# Altium PCB PCB.PcbDoc (part 3 of 4)
Units mm, origin at the board's own origin, x right, y up, seen from the top; angles counter-clockwise.
Board outline 38 x 42 mm, 4 copper layers (Top Layer, Inner GND 1, Inner GND 2, Bottom Layer), stack 1.62 mm thick; 195 components, 172 nets, 763 pads, 474 vias.
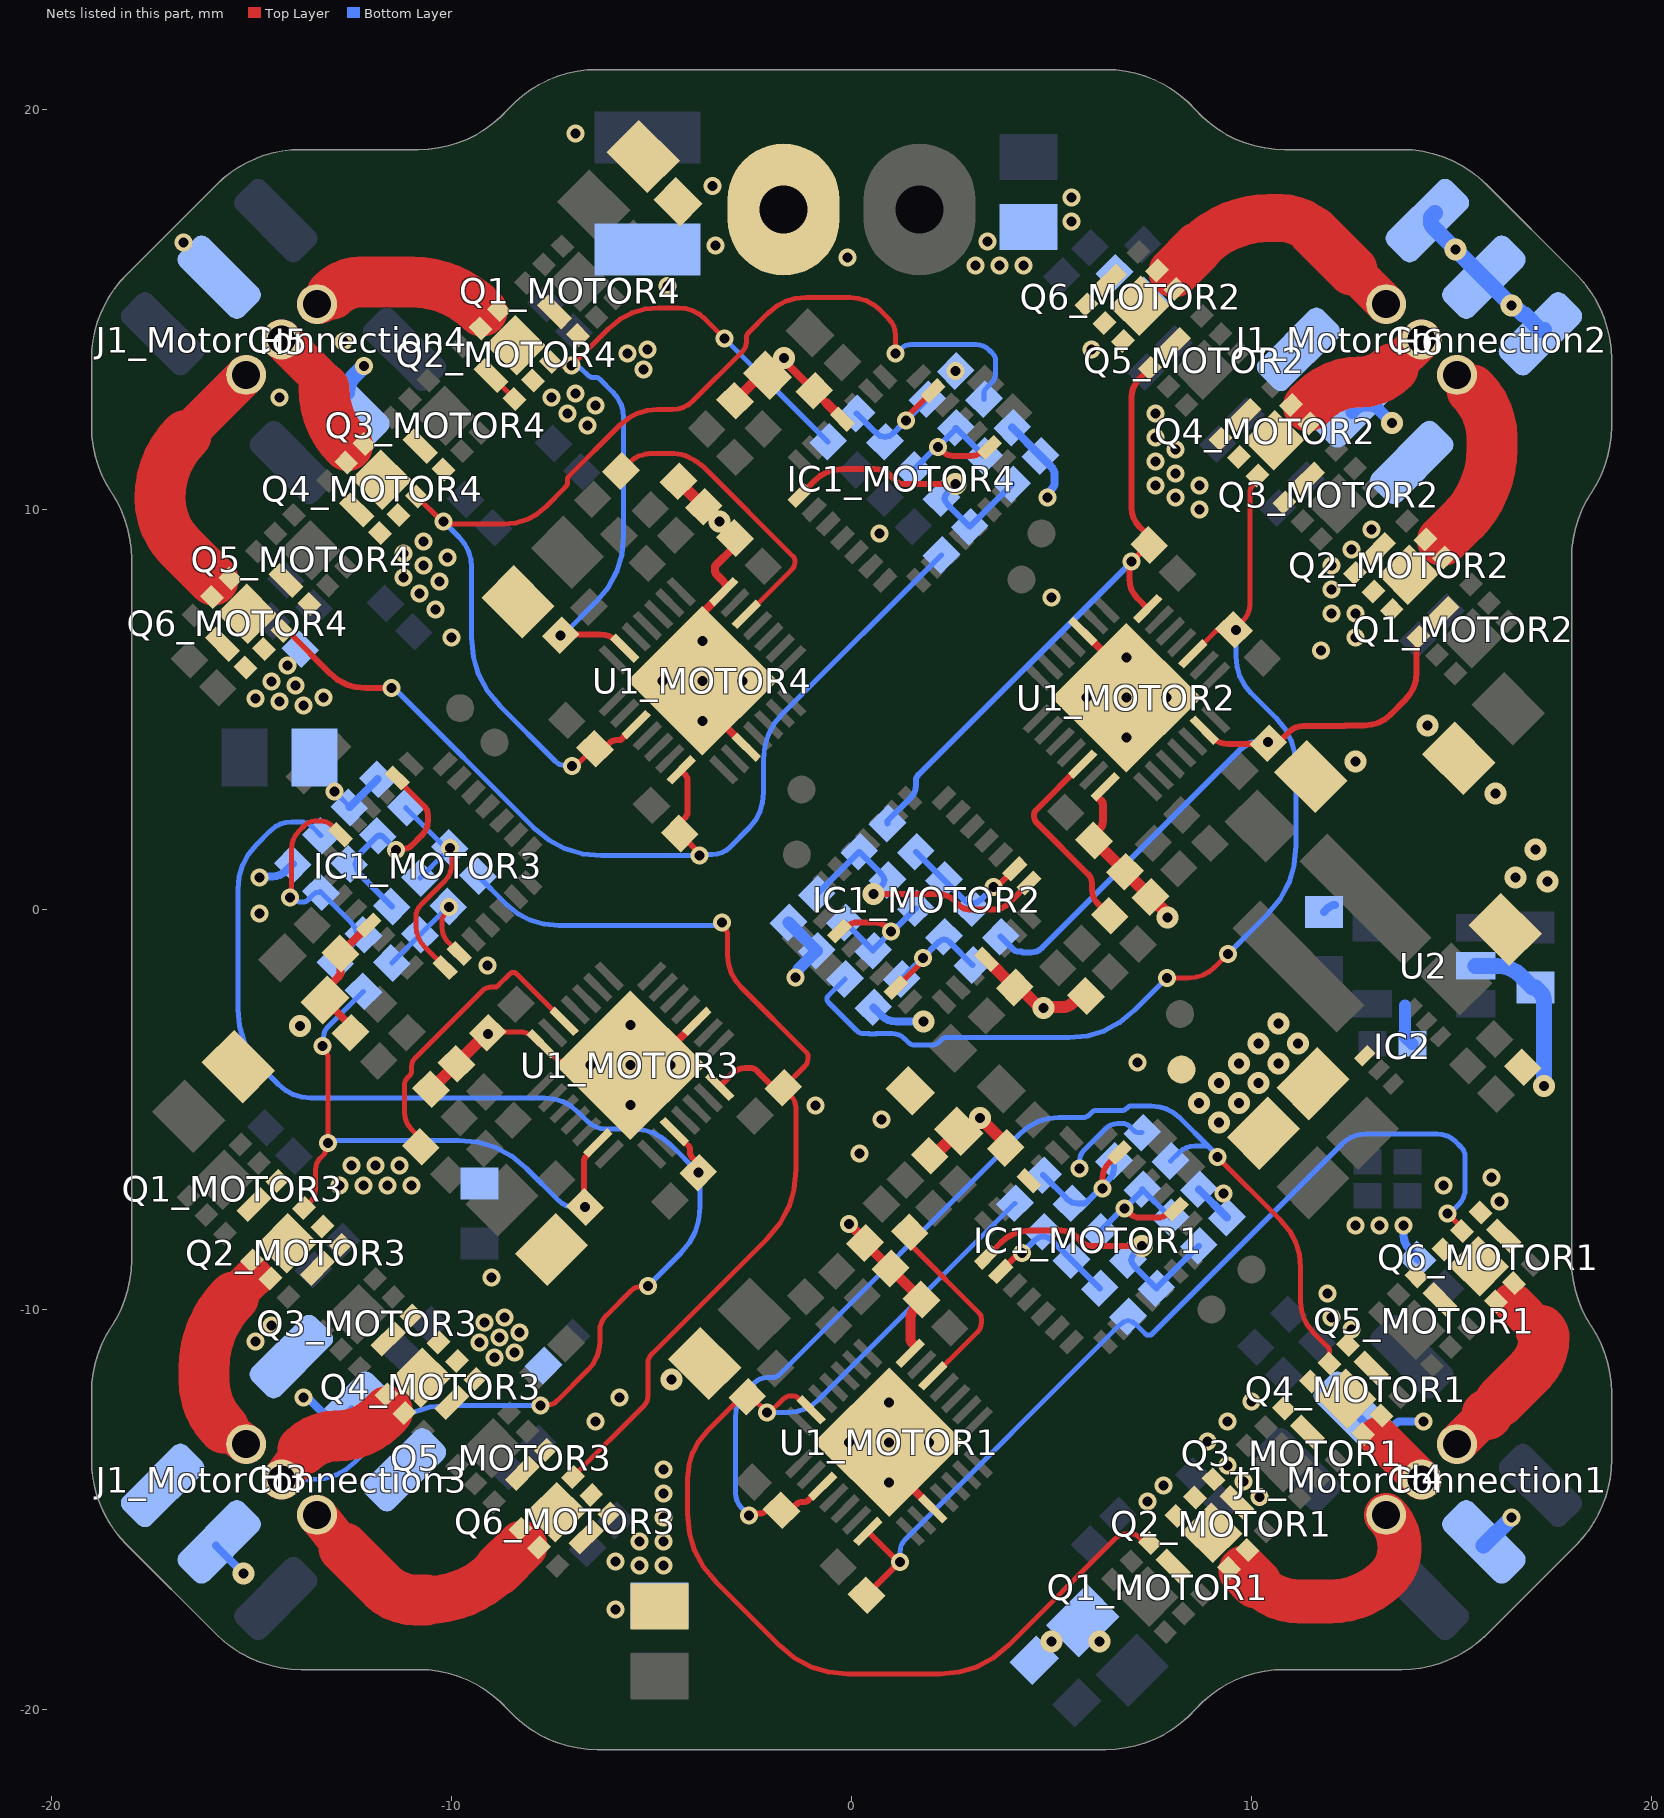
[diagram p5: the nets of this part, all layers, seen from the top]

## Via types
v1: diameter 0.45, hole 0.25, Top Layer to Bottom Layer, tented both sides, 381 vias
v2: diameter 0.55, hole 0.25, Top Layer to Bottom Layer, tented both sides, 93 vias

## Nets (pads, with @x,y where several pads share a name; then routed paths per layer and width w, separated by ;. In a path a pad name is that pad's centre, name@x,y a point inside that pad or via, vN(x,y) a via of type N, cw(c..) or ccw(c..) an arc to the next point about the centre after c; other vN are vias at no path point) (continued)
GND: C1_MOTOR1.1 C1_MOTOR2.1 C1_MOTOR3.1 C1_MOTOR4.1 C2_MOTOR1.1 C2_MOTOR2.1 C2_MOTOR3.1 C2_MOTOR4.1 C3_MOTOR1.1 C3_MOTOR2.1 C3_MOTOR3.1 C3_MOTOR4.1 C4_MOTOR1.1 C4_MOTOR2.1 C4_MOTOR3.1 C4_MOTOR4.1 C7_MOTOR1.1 C7_MOTOR2.1 C7_MOTOR3.1 C7_MOTOR4.1 C9_MOTOR1.1 C9_MOTOR2.1 C9_MOTOR3.1 C9_MOTOR4.1 C10_MOTOR1.1 C10_MOTOR2.1 C10_MOTOR3.1 C10_MOTOR4.1 C11_MOTOR1.1 C11_MOTOR2.1 C11_MOTOR3.1 C11_MOTOR4.1 C12_MOTOR1.1 C12_MOTOR2.1 C12_MOTOR3.1 C12_MOTOR4.1 C13_MOTOR1.1 C13_MOTOR2.1 C13_MOTOR3.1 C13_MOTOR4.1 C15.1 C16.1 C17.1 C18.1 C19.1 C20.1 C21.1 H1.1 H3.2 H3.5 H4.2 H4.5 H5.2 H5.5 H6.1 H6.2 H6.3 H6.5 IC1_MOTOR1.4 IC1_MOTOR2.4 IC1_MOTOR3.4 IC1_MOTOR4.4 IC2.4 Q2_MOTOR1.4 Q2_MOTOR1.8 Q2_MOTOR2.4 Q2_MOTOR2.8 Q2_MOTOR3.4 Q2_MOTOR3.8 Q2_MOTOR4.4 Q2_MOTOR4.8 Q4_MOTOR1.4 Q4_MOTOR1.8 Q4_MOTOR2.4 Q4_MOTOR2.8 Q4_MOTOR3.4 Q4_MOTOR3.8 Q4_MOTOR4.4 Q4_MOTOR4.8 Q6_MOTOR1.4 Q6_MOTOR1.8 Q6_MOTOR2.4 Q6_MOTOR2.8 Q6_MOTOR3.4 Q6_MOTOR3.8 Q6_MOTOR4.4 Q6_MOTOR4.8 R2_MOTOR1.1 R2_MOTOR2.1 R2_MOTOR3.1 R2_MOTOR4.1 R16_MOTOR1.1 R16_MOTOR2.1 R16_MOTOR3.1 R16_MOTOR4.1 R17_MOTOR1.1 R17_MOTOR2.1 R17_MOTOR3.1 R17_MOTOR4.1 R18_MOTOR1.1 R18_MOTOR2.1 R18_MOTOR3.1 R18_MOTOR4.1 R23.1 TP11.1 U1_MOTOR1.17 U1_MOTOR1.28 U1_MOTOR1.29 U1_MOTOR2.17 U1_MOTOR2.28 U1_MOTOR2.29 U1_MOTOR3.17 U1_MOTOR3.28 U1_MOTOR3.29 U1_MOTOR4.17 U1_MOTOR4.28 U1_MOTOR4.29 U2.2 | length 71.6
  Top Layer w0.125: R2_MOTOR3.1@-9.113,-3.109 v2(-9.091,-3.109) ; R2_MOTOR3.1@-9.037,-3.055 -8.305,-3.055 -8.212,-3.064 -8.126,-3.089 -8.047,-3.132 -7.975,-3.192 -7.824,-3.342 -7.815,-3.35 -7.806,-3.355 -7.795,-3.358 -7.784,-3.359 -7.768,-3.359 -7.761,-3.36 -7.755,-3.362 -7.75,-3.365 -7.745,-3.369 -7.446,-3.668 -7.329,-3.765 -7.201,-3.834 -7.062,-3.876 -6.91,-3.89 v2(-6.527,-3.89) U1_MOTOR3.29@-5.782,-3.89 ; Q2_MOTOR4.8@-9.014,13.352 Q2_MOTOR4.4@-8.429,12.767 ; v2@-1.856,13.71 -1.81,13.71 -1.792,13.711 -1.775,13.716 -1.76,13.725 -1.746,13.736 -1.703,13.779 -1.694,13.784 -1.691,13.774 -1.691,13.754 -1.69,13.74 -1.686,13.726 -1.679,13.714 v2@-1.67,13.703 ; C3_MOTOR1.1@0.323,-8.248 0.328,-8.255 0.333,-8.263 0.335,-8.271 0.336,-8.28 0.336,-8.302 0.337,-8.318 0.342,-8.333 0.349,-8.347 C3_MOTOR1.1@0.36,-8.36 ; v2(7.9,-0.2) v2@7.9,-0.152
  Top Layer w0.2: C9_MOTOR3.1@-12.527,-3.076 -12.527,-2.979 -12.531,-2.941 -12.542,-2.906 -12.559,-2.873 -12.584,-2.843 -13.084,-2.343 -13.119,-2.301 -13.144,-2.255 -13.159,-2.205 -13.164,-2.151 -13.164,-2.076 -13.161,-2.046 -13.153,-2.018 -13.139,-1.993 -13.12,-1.97 -12.831,-1.681 -12.806,-1.651 -12.789,-1.619 -12.778,-1.584 -12.775,-1.546 -12.775,-1.464 -12.774,-1.457 -12.773,-1.451 -12.77,-1.446 -12.765,-1.441 -12.759,-1.434 -12.757,-1.431 -12.755,-1.428 -12.754,-1.425 -12.754,-1.422 -12.754,-1.125 -12.754,-1.122 -12.755,-1.118 -12.757,-1.115 -12.759,-1.113 -12.765,-1.106 -12.769,-1.101 -12.77,-1.097 -12.769,-1.092 -12.765,-1.087 IC1_MOTOR3.4@-12.068,-0.389 ; U1_MOTOR3.29@-5.782,-3.89 v2(-5.527,-3.89) -5.101,-3.89 -5.034,-3.884 -4.972,-3.865 -4.914,-3.834 -4.862,-3.791 U1_MOTOR3.17@-3.865,-2.794 ; R2_MOTOR4.1@-2.914,9.291 -2.914,9.178 -2.918,9.134 -2.93,9.093 -2.951,9.055 -2.979,9.021 -3.388,8.612 -3.401,8.597 -3.41,8.58 -3.415,8.562 -3.417,8.542 -3.417,8.492 -3.414,8.456 -3.404,8.423 -3.388,8.392 -3.364,8.364 -3.204,8.204 -3.154,8.138 -3.138,8.072 -3.154,8.006 -3.204,7.94 -3.605,7.539 -3.659,7.475 -3.697,7.404 -3.72,7.327 -3.727,7.244 v2(-3.727,6.72) v2(-3.727,5.72) -3.727,5.409 -3.716,5.286 -3.682,5.173 -3.626,5.069 -3.547,4.974 U1_MOTOR4.17@-2.631,4.058 ; v2@-1.67,13.703 -0.775,12.808 -0.616,12.649 ; v2(0.937,-13.321) 0.937,-13.632 0.948,-13.755 0.982,-13.868 1.038,-13.972 1.117,-14.067 U1_MOTOR1.17@2.033,-14.983 ; C9_MOTOR1.1@1.955,-6.155 2.014,-6.155 2.038,-6.153 2.059,-6.147 2.079,-6.136 C9_MOTOR1.1@2.097,-6.121 ; C2_MOTOR1.1@3.855,-5.963 C2_MOTOR1.1@3.855,-5.904 ; U1_MOTOR2.17@5.777,6.959 6.693,6.043 6.772,5.949 6.828,5.845 6.862,5.731 6.873,5.609 v2(6.873,5.297) ; R2_MOTOR2.1@6.06,1.788 R2_MOTOR2.1@6.06,1.862 ; R2_MOTOR2.1@6.06,1.998 R2_MOTOR2.1@6.06,1.862 ; U1_MOTOR2.28@6.343,3.07 6.19,2.918 6.163,2.881 6.154,2.844 6.163,2.808 6.19,2.771 6.24,2.722 6.257,2.701 6.27,2.678 6.277,2.652 6.28,2.625 6.28,2.222 6.274,2.155 6.255,2.092 6.224,2.035 6.181,1.983 R2_MOTOR2.1@6.06,1.862
  Top Layer w0.25: C9_MOTOR4.1@-2.914,12.72 -1.973,13.661 -1.948,13.682 -1.92,13.698 -1.889,13.707 v2@-1.856,13.71 ; -0.616,12.649 IC1_MOTOR4.4@-0.227,12.26 ; v1(-0.062,-7.863) C3_MOTOR1.1@0.323,-8.248 ; C3_MOTOR1.1@0.36,-8.36 1.742,-9.742 1.745,-9.746 1.748,-9.751 1.749,-9.756 1.75,-9.762 1.75,-9.777 1.749,-9.787 1.746,-9.797 1.741,-9.806 1.735,-9.814 1.594,-9.954 1.539,-10.021 1.499,-10.094 1.475,-10.175 1.467,-10.261 1.467,-10.711 1.471,-10.749 1.481,-10.785 1.499,-10.817 1.523,-10.847 U1_MOTOR1.28@1.592,-10.915
  Top Layer w0.3: C3_MOTOR3.1@-10.512,-4.491 -9.143,-3.122 -9.136,-3.116 -9.129,-3.112 -9.121,-3.11 R2_MOTOR3.1@-9.113,-3.109 ; C3_MOTOR4.1@-4.328,10.705 R2_MOTOR4.1@-2.914,9.291 ; C9_MOTOR1.1@2.097,-6.121 C1_MOTOR1.1@2.679,-5.539 ; v2(3.209,-5.209) 3.821,-5.821 3.836,-5.839 3.847,-5.859 3.853,-5.88 C2_MOTOR1.1@3.855,-5.904 ; IC1_MOTOR2.4@3.373,-1.243 4.044,-1.914 4.063,-1.93 4.084,-1.941 4.107,-1.948 4.132,-1.95 4.167,-1.95 4.18,-1.952 4.193,-1.955 4.205,-1.962 4.215,-1.97 4.678,-2.434 4.694,-2.446 4.711,-2.456 4.729,-2.461 4.749,-2.463 v2(4.8,-2.463) ; v2@4.8,-2.5 4.834,-2.466 4.848,-2.454 4.864,-2.446 4.881,-2.44 4.9,-2.439 5.252,-2.439 5.337,-2.431 5.415,-2.408 5.487,-2.369 5.552,-2.314 5.653,-2.213 5.68,-2.191 5.709,-2.175 5.741,-2.166 5.775,-2.163 C9_MOTOR2.1@5.863,-2.163 ; R2_MOTOR2.1@6.06,1.788 6.063,1.758 6.071,1.731 6.084,1.706 6.103,1.683 7.872,-0.086 7.884,-0.1 7.893,-0.116 7.898,-0.134 v2@7.9,-0.152
  Bottom Layer w0.125: H3.5@-15.897,-15.9 H3.5@-15.897,-15.897 ; v1(-12.925,2.95) -12.561,2.586 -12.558,2.583 -12.557,2.58 -12.556,2.577 -12.556,2.574 R17_MOTOR3.1@-12.556,2.566 ; v1(5.7,-6.475) 5.7,-6.283 5.707,-6.207 5.728,-6.137 5.763,-6.072 5.811,-6.014 6.346,-5.479 6.414,-5.422 6.488,-5.382 6.569,-5.358 6.657,-5.35 6.779,-5.35 6.827,-5.354 6.872,-5.368 6.913,-5.39 6.95,-5.421 7.057,-5.528 7.084,-5.55 7.113,-5.565 7.144,-5.575 7.178,-5.578 R16_MOTOR1.1@7.265,-5.578 ; H6.5@12.503,12.445 H6.5@12.503,12.503
  Bottom Layer w0.2: H3.5@-15.895,-15.905 v2(-15.2,-16.6) ; v1(-14.8,0.8) -14.782,0.818 -14.774,0.824 -14.766,0.829 -14.757,0.832 -14.747,0.833 -14.473,0.833 -14.379,0.841 -14.292,0.867 -14.212,0.91 -14.14,0.97 R16_MOTOR3.1@-13.97,1.139 R16_MOTOR3.1@-13.97,1.139 ; v1(-13.697,-12.195) -13.671,-12.221 -13.66,-12.23 -13.647,-12.237 -13.634,-12.241 -13.619,-12.242 -13.585,-12.242 -13.572,-12.244 -13.56,-12.247 -13.548,-12.253 -13.538,-12.262 -13.275,-12.525 -13.198,-12.589 -13.114,-12.635 -13.022,-12.662 -12.923,-12.671 -12.722,-12.671 -12.697,-12.669 -12.675,-12.662 -12.654,-12.651 -12.635,-12.635 H3.2@-12.592,-12.591 H3.2@-12.503,-12.503 ; H5.5@-12.614,12.923 -12.614,12.628 -12.613,12.621 -12.612,12.615 -12.608,12.609 -12.604,12.604 H5.5@-12.592,12.591 ; R17_MOTOR3.1@-12.556,2.566 -12.553,2.558 -12.547,2.562 R18_MOTOR3.1@-11.849,3.26 ; R16_MOTOR2.1@0.545,-2.445 0.74,-2.64 0.824,-2.71 0.916,-2.76 1.016,-2.79 1.125,-2.8 v2(1.8,-2.8) ; R17_MOTOR4.1@4.015,12.048 R18_MOTOR4.1@4.723,11.341 4.988,11.075 5.026,11.03 5.054,10.979 5.07,10.924 5.076,10.865 5.076,10.679 5.072,10.634 5.059,10.593 5.039,10.555 5.01,10.52 4.93,10.44 4.915,10.422 4.904,10.403 4.898,10.381 4.896,10.358 v1(4.896,10.3) ; R17_MOTOR1.1@8.68,-6.992 R18_MOTOR1.1@9.387,-7.699 ; C21.1@11.809,-0.059 11.904,0.036 11.944,0.069 11.989,0.094 12.038,0.108 C21.1@12.09,0.113 ; H4.2@12.503,-12.503 H4.2@12.591,-12.591 12.821,-12.821 12.902,-12.889 12.992,-12.937 13.089,-12.966 13.195,-12.976 13.366,-12.976 13.42,-12.971 13.47,-12.956 13.515,-12.931 13.557,-12.897 13.61,-12.844 13.633,-12.824 13.658,-12.811 13.686,-12.803 13.715,-12.8 v1(14.3,-12.8) ; v1(13.8,-7.9) 13.8,-8.142 13.809,-8.237 13.835,-8.325 13.879,-8.406 13.94,-8.479 14.127,-8.666 14.136,-8.677 14.142,-8.688 14.145,-8.7 14.146,-8.713 C13_MOTOR1.1@14.146,-8.746
  Bottom Layer w0.3: R18_MOTOR2.1@-1.577,-0.324 R17_MOTOR2.1@-0.87,-1.031 -1.318,-1.479 -1.333,-1.497 -1.344,-1.517 -1.35,-1.539 -1.352,-1.562 -1.352,-1.622 -1.354,-1.636 -1.358,-1.65 -1.364,-1.662 -1.374,-1.674 v1(-1.4,-1.7) ; H6.5@12.503,12.445 12.511,12.418 12.536,12.431 12.628,12.523 12.668,12.556 12.711,12.579 12.759,12.593 12.81,12.598 12.959,12.598 13.018,12.593 13.073,12.576 13.123,12.549 13.169,12.511 v2(13.512,12.168) ; 13.837,-2.404 13.837,-3.186 14.007,-3.356 C20.1@14.029,-3.356
  Bottom Layer w0.4: H5.5@-12.614,12.923 -12.603,13.039 -12.572,13.146 -12.518,13.244 -12.444,13.334 v1(-12.185,13.592) ; H6.1@14.586,17.415 14.517,17.345 14.502,17.327 14.491,17.308 14.485,17.286 14.483,17.263 14.483,17.205 14.486,17.163 14.498,17.124 14.517,17.088 14.544,17.056 v2(15.1,16.5) 16.481,15.119 16.491,15.111 16.502,15.105 16.514,15.101 16.527,15.1 16.545,15.1 16.552,15.099 16.559,15.097 16.565,15.094 16.571,15.089 16.77,14.89 16.778,14.883 16.787,14.878 16.797,14.875 16.807,14.874 16.822,14.874 16.828,14.874 16.833,14.872 16.838,14.87 16.842,14.866 17.198,14.51 17.213,14.498 17.228,14.49 17.245,14.485 17.264,14.483 H6.3@17.311,14.483 ; U2.2@15.604,-1.409 16.141,-1.409 16.307,-1.424 16.46,-1.47 16.601,-1.546 16.729,-1.652 17.002,-1.926 17.015,-1.936 17.028,-1.944 17.043,-1.948 17.06,-1.95 17.082,-1.95 17.091,-1.951 17.1,-1.953 17.107,-1.957 17.114,-1.963 17.221,-2.07 17.26,-2.116 17.287,-2.167 17.304,-2.222 17.309,-2.282 v2(17.309,-4.409) ; H4.5@15.803,-15.897 v1(16.5,-15.2)
  other v1: -5.9,-17.5 -5.3,-16.4 -4.7,-16.4 -5.9,-16.3 -5.3,-15.8 -4.7,-15.8 -4.7,-15.2 7.4,-14.8 10.204,-14.69 -4.7,-14.6 7.8,-14.4 9.8,-14.3 -4.7,-14 9.4,-13.9 8.9,-13.3 -6.4,-12.8 9.4,-12.8 10,-12.3 -5.8,-12.2 -8.925,-11.2 -8.425,-11.075 -9.3,-10.825 -14.9,-10.8 -8.8,-10.7 -8.3,-10.575 12.5,-10.5 -14.5,-10.4 -9.175,-10.325 -8.675,-10.2 12,-10.2 11.9,-9.6 -9,-9.2 12.6,-7.9 13.2,-7.9 16.2,-7.3 9.296,-7.104 -12.8,-6.9 -12.2,-6.9 -11.6,-6.9 -11,-6.9 14.8,-6.9 16,-6.7 -12.5,-6.4 -11.9,-6.4 -11.3,-6.4 0.2,-6.1 0.75,-5.25 -0.9,-4.9 7.15,-3.825 -9.1,-1.4 -14.8,-0.1 -13.7,5.1 -14.3,5.2 -14.905,5.278 -13.2,5.3 -13.9,5.6 -14.5,5.7 -14.1,6.1 11.74,6.481 -10,6.8 12.6,6.8 12,7.4 12.6,7.4 -10.4,7.5 5,7.8 -10.8,7.9 12,8 -10.3,8.2 -11.2,8.3 -10.7,8.6 12,8.6 -10.1,8.8 -11.2,8.9 12.5,9 -10.7,9.2 0.7,9.4 13,9.5 8.7,10 8.1,10.3 7.6,10.6 8.7,10.6 8.1,10.9 7.6,11.2 8.1,11.5 7.6,11.8 -6.6,12.1 -7.1,12.4 7.6,12.4 -6.4,12.6 -14.3,12.8 -7.5,12.8 -6.9,12.9 2.601,13.463 -5.2,13.5 -5.6,13.9 -5.1,14 6,14 -12.7,14.2 -4.6,15.583 3.1,16.1 3.7,16.1 4.3,16.1 -0.1,16.3 -3.4,16.6 -16.7,16.675 3.4,16.7 5.5,17.2 5.5,17.8 -3.482,18.088 -6.9,19.4
  other v2: 5,-18.3 6.2,-18.3 0.937,-14.321 -0.063,-13.321 1.937,-13.321 0.937,-12.321 -4.5,-11.75 9.186,-5.328 -5.527,-4.89 8.691,-4.833 9.681,-4.833 9.186,-4.338 10.176,-4.338 -4.527,-3.89 9.681,-3.843 10.671,-3.843 10.176,-3.348 11.166,-3.348 -13.791,-2.909 -5.527,-2.89 10.671,-2.853 17.4,0.7 16.6,0.8 17.1,1.5 16.1,2.9 12.6,3.7 6.873,4.297 14.4,4.6 -3.727,4.72 5.873,5.297 7.873,5.297 -4.727,5.72 -2.727,5.72 6.873,6.297 -3.3,9.7 -1.691,13.791 16.5,15.1
MCU_ADC1: H3.3
MCU_I2C0_SCL: H6.4
MCU_I2C0_SDA: H6.6
MCU_UART1_RX: H3.4
MCU_UART1_TX: H3.1
OCREF_MOTOR1: R5_MOTOR1.1 U1_MOTOR1.26 | length 4.8
  Top Layer w0.125: R5_MOTOR1.1@1.458,-8.067 1.458,-8.227 1.463,-8.29 1.481,-8.348 1.51,-8.401 1.55,-8.45 3.19,-10.09 3.214,-10.119 3.231,-10.151 3.242,-10.186 3.245,-10.224 3.245,-10.32 3.239,-10.389 3.22,-10.453 3.188,-10.511 3.144,-10.564 2.417,-11.291 2.054,-11.654 2.051,-11.656 2.048,-11.658 2.045,-11.659 2.042,-11.659 U1_MOTOR1.26@2.033,-11.659
OCREF_MOTOR2: R5_MOTOR2.1 U1_MOTOR2.26 | length 5
  Top Layer w0.15: U1_MOTOR2.26@5.777,3.636 5.768,3.636 5.765,3.635 5.762,3.635 5.759,3.633 5.756,3.631 4.601,2.476 4.585,2.457 4.574,2.436 4.567,2.413 4.565,2.388 4.565,2.325 4.569,2.28 4.581,2.239 4.602,2.201 4.631,2.166 5.922,0.875 5.96,0.829 5.987,0.779 6.004,0.724 6.009,0.665 6.009,0.515 6.019,0.407 6.049,0.307 6.098,0.216 6.167,0.133 R5_MOTOR2.1@6.455,-0.155
OCREF_MOTOR3: R5_MOTOR3.1 U1_MOTOR3.26 | length 7.5
  Top Layer w0.125: R5_MOTOR3.1@-10.772,-5.928 -10.772,-5.817 -10.776,-5.774 -10.788,-5.733 -10.808,-5.696 -10.836,-5.663 -10.994,-5.505 -11.073,-5.409 -11.13,-5.305 -11.164,-5.19 -11.175,-5.067 -11.175,-4.387 -11.171,-4.333 -11.156,-4.284 -11.131,-4.238 -11.097,-4.197 -11.043,-4.143 -11.024,-4.121 -11.011,-4.096 -11.003,-4.068 -11,-4.039 -11,-3.907 -10.995,-3.856 -10.981,-3.808 -10.957,-3.764 -10.924,-3.724 -9.226,-2.026 -9.182,-1.989 -9.133,-1.963 -9.08,-1.947 -9.022,-1.941 -8.941,-1.941 -8.91,-1.939 -8.881,-1.93 -8.854,-1.915 -8.829,-1.895 -8.543,-1.609 -8.526,-1.594 -8.507,-1.584 -8.486,-1.578 -8.463,-1.576 -8.432,-1.576 -8.42,-1.577 -8.408,-1.58 -8.398,-1.586 -8.388,-1.594 U1_MOTOR3.26@-7.189,-2.794
OCREF_MOTOR4: R5_MOTOR4.1 U1_MOTOR4.26 | length 7.4
  Top Layer w0.125: R5_MOTOR4.1@-5.765,10.965 -5.537,11.193 -5.438,11.275 -5.33,11.334 -5.208,11.37 -5.158,11.383 -5.107,11.393 -5.055,11.398 -5.004,11.4 -4.443,11.4 -4.344,11.394 -4.249,11.376 -4.157,11.347 -4.067,11.305 -3.945,11.239 -3.9,11.213 -3.856,11.185 -3.813,11.154 -3.772,11.122 -3.673,11.04 -1.455,8.822 -1.439,8.802 -1.428,8.781 -1.421,8.759 -1.419,8.734 -1.419,8.671 -1.423,8.626 -1.435,8.584 -1.456,8.546 -1.485,8.512 -2.61,7.386 -2.613,7.384 -2.616,7.383 -2.619,7.382 -2.622,7.381 U1_MOTOR4.26@-2.631,7.381
PHASE_A1: C5_MOTOR1.1 J1_MotorConnection1.1 Q1_MOTOR1.4 Q1_MOTOR1.8 Q2_MOTOR1.1 Q2_MOTOR1.2 Q2_MOTOR1.5 Q2_MOTOR1.6 Q2_MOTOR1.7 R13_MOTOR1.1 U1_MOTOR1.6 | length 34.6
  Top Layer w0.125: v1@-2.149,-12.601 -2.149,-12.564 -2.15,-12.55 -2.154,-12.536 -2.161,-12.524 -2.17,-12.513 -2.455,-12.228 -2.479,-12.208 -2.505,-12.194 -2.533,-12.186 -2.563,-12.183 -2.641,-12.183 -2.697,-12.188 -2.748,-12.203 -2.795,-12.229 -2.838,-12.264 -3.599,-13.026 -3.818,-13.289 -3.975,-13.578 -4.069,-13.893 -4.1,-14.235 -4.1,-15.1 -4.056,-15.582 -3.923,-16.027 -3.702,-16.435 -3.393,-16.807 -1.798,-18.402 -1.426,-18.711 -1.018,-18.932 -0.573,-19.065 -0.091,-19.109 2.209,-19.109 2.691,-19.065 3.136,-18.932 3.544,-18.711 3.916,-18.402 6.584,-15.734 6.65,-15.679 6.722,-15.64 6.8,-15.617 6.885,-15.609 7.004,-15.609 7.05,-15.613 7.093,-15.626 7.133,-15.648 7.169,-15.678 7.283,-15.791 7.305,-15.81 7.329,-15.823 7.355,-15.831 7.384,-15.833 Q1_MOTOR1.4@7.456,-15.833 ; v1(-2.115,-12.567) -2.075,-12.567 -2.059,-12.566 -2.045,-12.562 -2.032,-12.554 -2.019,-12.544 -1.715,-12.24 -1.674,-12.206 -1.629,-12.181 -1.579,-12.167 -1.526,-12.162 -1.451,-12.162 -1.421,-12.164 -1.394,-12.172 -1.369,-12.186 -1.346,-12.205 -1.055,-12.496 -1.049,-12.501 -1.042,-12.505 -1.035,-12.507 -1.027,-12.508 U1_MOTOR1.6@-1.008,-12.508
  Top Layer w1.1: 10.115,-16.84 ccw(c11.224,-15.731) 11.224,-17.3 11.951,-17.3 ccw(c11.951,-15.251) 13.4,-16.7 ccw(c12.676,-15.976) 13.7,-15.976 13.7,-15.94 ccw(c12.56,-15.94) J1_MotorConnection1.1@13.366,-15.134
  Top Layer w1.273: 9.811,-16.537 10.115,-16.84
  Bottom Layer w0.125: v1(-2.115,-12.567) -1.578,-12.567 -1.366,-12.548 -1.17,-12.49 -0.991,-12.393 -0.827,-12.257 R13_MOTOR1.1@4.083,-7.346
PHASE_A2: C5_MOTOR2.1 J1_MotorConnection2.1 Q1_MOTOR2.4 Q1_MOTOR2.8 Q2_MOTOR2.1 Q2_MOTOR2.2 Q2_MOTOR2.5 Q2_MOTOR2.6 Q2_MOTOR2.7 R13_MOTOR2.1 U1_MOTOR2.6 | length 20.9
  Top Layer w0.15: U1_MOTOR2.6@8.818,4.484 8.837,4.484 8.845,4.484 8.852,4.482 8.858,4.478 8.864,4.473 9.049,4.289 9.128,4.223 9.215,4.176 9.31,4.148 9.412,4.138 C5_MOTOR2.1@10.297,4.138 ; C5_MOTOR2.1@10.418,4.159 C5_MOTOR2.1@10.44,4.181 ; C5_MOTOR2.1@10.419,4.181 10.414,4.186 10.412,4.19 10.416,4.191 10.567,4.191 10.627,4.196 10.682,4.213 10.733,4.24 10.779,4.279 10.95,4.45 11.024,4.512 11.106,4.556 11.194,4.582 11.29,4.591 12.331,4.591 12.335,4.591 12.338,4.592 12.342,4.594 12.345,4.597 12.349,4.601 12.35,4.602 12.352,4.603 12.354,4.604 12.356,4.604 12.823,4.604 13.006,4.621 13.176,4.671 13.332,4.756 13.474,4.874 13.833,5.233 13.961,5.387 14.053,5.557 14.108,5.742 14.127,5.942 14.127,6.562 14.128,6.577 14.132,6.591 14.139,6.604 14.149,6.616 14.164,6.631 14.169,6.637 14.173,6.644 14.175,6.652 14.176,6.661 Q1_MOTOR2.4@14.176,6.82
  Top Layer w1: J1_MotorConnection2.1@15.134,13.366 15.514,12.986
  Top Layer w1.273: 14.777,9.223 15.265,9.712 ccw(c13.469,11.508) 16.009,11.508 16.009,11.791 ccw(c14.319,11.791) 15.514,12.986
  Bottom Layer w0.15: R13_MOTOR2.1@3.727,-0.678 4.052,-1.003 4.078,-1.024 4.105,-1.039 4.136,-1.048 4.168,-1.051 4.238,-1.051 4.244,-1.052 4.25,-1.054 4.256,-1.057 4.261,-1.061 4.267,-1.067 4.27,-1.07 4.273,-1.071 4.276,-1.072 4.28,-1.072 4.481,-1.072 4.56,-1.065 4.633,-1.043 4.701,-1.007 4.762,-0.956 9.747,4.029 9.831,4.098 9.922,4.148 10.023,4.178 10.131,4.188 v1@10.404,4.188 ; v1@10.407,4.189 v1(10.409,4.191)
PHASE_A3: C5_MOTOR3.1 J1_MotorConnection3.1 Q1_MOTOR3.4 Q1_MOTOR3.8 Q2_MOTOR3.1 Q2_MOTOR3.2 Q2_MOTOR3.5 Q2_MOTOR3.6 Q2_MOTOR3.7 R13_MOTOR3.1 U1_MOTOR3.6 | length 19.8
  Top Layer w0.125: Q2_MOTOR3.6@-13.685,-7.463 -13.528,-7.306 -13.472,-7.239 -13.432,-7.164 -13.408,-7.084 -13.4,-6.996 -13.4,-6.495 -13.393,-6.417 -13.372,-6.346 -13.336,-6.28 -13.287,-6.221 -13.208,-6.142 -13.181,-6.11 -13.163,-6.076 -13.152,-6.038 -13.148,-5.998 -13.148,-5.934 -13.146,-5.915 -13.141,-5.897 -13.132,-5.881 -13.12,-5.866 v1(-13.086,-5.832) ; v1(-13.224,-3.406) -13.224,-3.454 -13.222,-3.473 -13.217,-3.491 -13.208,-3.507 -13.196,-3.522 -13.138,-3.579 -13.117,-3.604 -13.103,-3.631 -13.094,-3.661 -13.091,-3.693 v1@-13.091,-5.832
  Top Layer w0.15: v1(-6.665,-7.435) -6.677,-7.423 -6.681,-7.418 -6.684,-7.413 -6.686,-7.407 -6.686,-7.4 -6.686,-7.067 -6.686,-6.29 -6.683,-6.254 -6.673,-6.221 -6.657,-6.191 -6.634,-6.163 -6.581,-6.111 -6.576,-6.105 -6.573,-6.098 -6.571,-6.091 -6.57,-6.084 -6.57,-6.073 -6.57,-6.069 -6.569,-6.065 -6.567,-6.061 -6.564,-6.058 U1_MOTOR3.6@-6.34,-5.834
  Top Layer w1: -15.695,-12.957 J1_MotorConnection3.1@-15.134,-13.366 ; -15.446,-9.683 -14.957,-9.195
  Top Layer w1.273: -15.695,-12.957 cw(c-14.5,-11.762) -16.19,-11.762 -16.19,-11.479 cw(c-13.65,-11.479) -15.446,-9.683
  Bottom Layer w0.125: v1(-13.224,-3.406) -13.21,-3.392 -13.206,-3.387 -13.202,-3.38 -13.2,-3.373 -13.2,-3.366 -13.2,-3.187 -13.193,-3.116 -13.174,-3.051 -13.141,-2.991 -13.096,-2.937 R13_MOTOR3.1@-12.202,-2.043 ; v1(-13.086,-5.832) -13.051,-5.798 -13.037,-5.786 -13.021,-5.777 -13.003,-5.772 -12.984,-5.77 -12.854,-5.77 ; -12.851,-5.769 -12.85,-5.767 -9.833,-5.767 -9.351,-5.812 -8.906,-5.944 -8.497,-6.165 -8.125,-6.475 -7.324,-7.276 -7.241,-7.345 -7.149,-7.395 -7.049,-7.425 -6.94,-7.435 v1(-6.665,-7.435)
PHASE_A4: C5_MOTOR4.1 J1_MotorConnection4.1 Q1_MOTOR4.4 Q1_MOTOR4.8 Q2_MOTOR4.1 Q2_MOTOR4.2 Q2_MOTOR4.5 Q2_MOTOR4.6 Q2_MOTOR4.7 R13_MOTOR4.1 U1_MOTOR4.6 | length 23.1
  Top Layer w0.125: Q2_MOTOR4.6@-7.51,13.687 -7.393,13.687 -7.356,13.683 -7.321,13.673 -7.289,13.656 -7.26,13.631 -7.223,13.594 -7.207,13.581 -7.189,13.571 -7.17,13.566 -7.149,13.564 v1@-6.996,13.564 ; v1(-6.996,13.597) -6.065,14.529 -5.795,14.753 -5.499,14.913 -5.177,15.009 -4.827,15.041 -4.34,15.041 -4.148,15.024 -3.971,14.971 -3.808,14.883 -3.66,14.76 v1(-3.174,14.274)
  Top Layer w0.15: v1(-7.273,6.858) -6.94,6.858 -6.933,6.858 -6.927,6.86 -6.922,6.863 -6.917,6.867 -6.91,6.874 -6.907,6.876 -6.904,6.878 -6.901,6.879 -6.897,6.879 -6.274,6.879 -6.168,6.869 -6.07,6.84 -5.98,6.791 -5.898,6.723 -5.719,6.544 -5.713,6.539 -5.706,6.536 -5.699,6.534 -5.691,6.533 U1_MOTOR4.6@-5.672,6.533
  Top Layer w1: J1_MotorConnection4.1@-13.366,15.134 ccw(c-13.366,15.419) -13.165,15.217 J1_MotorConnection4.1@-12.991,15.391
  Top Layer w1.273: J1_MotorConnection4.1@-12.991,15.391 cw(c-12.267,14.667) -12.267,15.691 -11.009,15.691 cw(c-11.009,13.191) -9.241,14.959
  Bottom Layer w0.125: v1(-7.273,6.858) -7.246,6.858 -7.236,6.859 -7.226,6.862 -7.217,6.866 -7.209,6.873 -6.379,7.703 -6.082,8.06 -5.87,8.452 -5.742,8.88 -5.7,9.342 -5.7,12.284 -5.717,12.468 -5.767,12.638 -5.852,12.794 -5.97,12.935 -6.299,13.265 -6.318,13.28 -6.338,13.291 -6.36,13.298 -6.384,13.3 -6.444,13.3 -6.488,13.304 -6.528,13.316 -6.564,13.336 -6.598,13.364 -6.73,13.495 -6.75,13.513 -6.774,13.525 -6.799,13.533 -6.826,13.535 -6.895,13.535 -6.914,13.537 -6.931,13.542 -6.948,13.551 -6.962,13.563 v1(-6.996,13.597) ; v1(-3.174,14.274) R13_MOTOR4.1@-0.588,11.688
PHASE_B1: C8_MOTOR1.1 J1_MotorConnection1.2 Q3_MOTOR1.4 Q3_MOTOR1.8 Q4_MOTOR1.1 Q4_MOTOR1.2 Q4_MOTOR1.5 Q4_MOTOR1.6 Q4_MOTOR1.7 R14_MOTOR1.1 U1_MOTOR1.10 | length 29.3
  Top Layer w0.125: v1(9.143,-6.185) 10.739,-7.781 10.952,-8.036 11.103,-8.317 11.195,-8.623 11.225,-8.954 11.225,-9.794 11.245,-10.015 11.306,-10.22 11.408,-10.407 11.55,-10.578 11.905,-10.934 11.923,-10.955 11.936,-10.979 11.944,-11.005 11.946,-11.032 11.946,-11.103 11.946,-11.106 11.945,-11.109 11.944,-11.112 11.941,-11.115 11.936,-11.12 11.932,-11.125 11.929,-11.13 11.927,-11.136 11.927,-11.142 11.927,-11.311 11.927,-11.317 11.929,-11.323 11.932,-11.328 11.936,-11.332 Q4_MOTOR1.5@11.946,-11.343
  Top Layer w0.15: v1(-2.56,-15.143) -2.538,-15.121 -2.529,-15.113 -2.518,-15.108 -2.507,-15.104 -2.495,-15.103 -2.292,-15.103 -2.259,-15.1 -2.229,-15.091 -2.202,-15.076 -2.176,-15.055 -2.144,-15.023 -2.13,-15.012 -2.115,-15.003 -2.099,-14.998 -2.081,-14.997 -1.785,-14.997 -1.778,-14.997 -1.772,-14.999 -1.767,-15.002 -1.762,-15.006 -1.755,-15.013 -1.753,-15.015 -1.75,-15.017 -1.746,-15.018 -1.743,-15.018 -1.625,-15.018 -1.578,-15.014 -1.535,-15.001 -1.495,-14.979 -1.459,-14.95 -1.38,-14.87 -1.346,-14.842 -1.309,-14.822 -1.269,-14.81 -1.225,-14.806 -1.164,-14.806 -1.14,-14.804 -1.117,-14.797 -1.097,-14.786 -1.078,-14.77 U1_MOTOR1.10@-0.725,-14.417
  Top Layer w1: 13.17,-13.178 cw(c13.17,-13.198) 13.184,-13.184 J1_MotorConnection1.2@14.25,-14.25 cw(c14.25,-14.23) J1_MotorConnection1.2@14.236,-14.244
  Bottom Layer w0.125: v1(-2.56,-15.143) -2.747,-14.956 -2.814,-14.875 -2.862,-14.787 -2.89,-14.69 -2.9,-14.586 -2.9,-12.682 -2.883,-12.498 -2.832,-12.328 -2.748,-12.172 -2.63,-12.03 -2.433,-11.833 -2.363,-11.775 -2.286,-11.733 -2.203,-11.708 -2.112,-11.7 -1.985,-11.7 -1.936,-11.695 -1.89,-11.682 -1.847,-11.659 -1.809,-11.627 4.218,-5.6 4.428,-5.425 4.659,-5.3 4.911,-5.225 5.184,-5.2 5.764,-5.2 5.817,-5.195 5.867,-5.18 5.912,-5.156 5.954,-5.121 6.007,-5.068 6.029,-5.049 6.054,-5.036 6.082,-5.028 6.111,-5.025 6.755,-5.025 6.789,-5.022 6.82,-5.013 6.849,-4.997 6.875,-4.975 6.908,-4.942 6.922,-4.93 6.938,-4.922 6.955,-4.916 6.974,-4.915 7.491,-4.915 7.695,-4.934 7.884,-4.99 8.057,-5.083 8.214,-5.214 8.909,-5.909 ; R14_MOTOR1.1@7.973,-6.285 7.976,-6.285 7.978,-6.285 7.979,-6.285 7.981,-6.284 7.982,-6.283 8.187,-6.077 8.276,-6.004 8.373,-5.951 8.479,-5.92 8.594,-5.909 8.909,-5.909 ; v1(9.143,-6.185) 9.143,-6.162 9.142,-6.153 9.14,-6.144 9.136,-6.137 9.13,-6.13 8.909,-5.909
PHASE_B2: C8_MOTOR2.1 J1_MotorConnection2.2 Q3_MOTOR2.4 Q3_MOTOR2.8 Q4_MOTOR2.1 Q4_MOTOR2.2 Q4_MOTOR2.5 Q4_MOTOR2.6 Q4_MOTOR2.7 R14_MOTOR2.1 U1_MOTOR2.10 | length 29.9
  Top Layer w0.125: v1(7.88,-1.709) 8.427,-1.709 8.611,-1.692 8.781,-1.641 8.937,-1.557 9.079,-1.439 v1(9.409,-1.109) ; U1_MOTOR2.10@8.535,6.394 9.102,6.96 9.107,6.965 9.114,6.968 9.121,6.971 9.129,6.971 9.139,6.971 9.144,6.972 9.147,6.973 9.151,6.975 9.154,6.977 9.175,6.999 9.184,7.006 9.194,7.011 9.205,7.015 9.217,7.016 9.526,7.016 9.532,7.015 9.538,7.013 9.544,7.01 9.549,7.006 9.555,7 9.558,6.998 9.56,6.997 9.563,6.998 9.565,7 9.781,7.216 9.859,7.309 9.914,7.411 9.947,7.522 9.958,7.642 9.958,10.416 9.963,10.473 9.979,10.527 10.005,10.575 10.042,10.62 10.105,10.682 10.123,10.704 10.135,10.727 10.143,10.753 10.146,10.78 Q4_MOTOR2.6@10.146,10.85
  Top Layer w0.15: 13.546,13.532 13.546,13.546
  Top Layer w1: 13.532,13.532 J1_MotorConnection2.2@14.25,14.25
  Top Layer w1.273: 11.418,12.582 11.544,12.708 cw(c12.709,11.543) 12.709,13.191 ccw(c12.709,14.355) 13.532,13.532
  Bottom Layer w0.125: R14_MOTOR2.1@-0.163,-1.738 -0.592,-2.168 -0.6,-2.177 -0.606,-2.188 -0.609,-2.199 -0.61,-2.212 -0.61,-2.243 -0.608,-2.265 -0.602,-2.286 -0.592,-2.305 -0.577,-2.323 0.125,-3.025 0.164,-3.058 0.208,-3.081 0.255,-3.095 0.306,-3.1 0.431,-3.1 0.433,-3.1 0.436,-3.101 0.438,-3.102 0.44,-3.104 0.443,-3.106 0.444,-3.107 0.445,-3.108 0.446,-3.108 0.448,-3.109 0.596,-3.109 0.599,-3.108 0.601,-3.108 0.604,-3.106 0.606,-3.105 0.608,-3.102 0.609,-3.101 ; v1(7.88,-1.709) 7.06,-2.529 6.707,-2.823 6.32,-3.032 5.897,-3.158 5.44,-3.2 2.367,-3.2 2.335,-3.203 2.305,-3.212 2.278,-3.227 2.253,-3.247 2.195,-3.305 2.149,-3.343 2.1,-3.37 2.045,-3.386 1.987,-3.391 1.594,-3.391 1.544,-3.387 1.499,-3.373 1.457,-3.351 1.419,-3.319 1.331,-3.231 1.262,-3.174 1.186,-3.133 1.104,-3.108 1.014,-3.1 0.614,-3.1 0.612,-3.1 0.611,-3.101 ; v1(9.409,-1.109) 10.402,-0.116 10.711,0.256 10.932,0.664 11.065,1.109 11.109,1.591 11.109,3.579 11.078,3.922 10.983,4.239 10.826,4.53 10.606,4.794 9.991,5.409 9.824,5.61 9.704,5.831 9.633,6.071 9.609,6.331 v1(9.609,6.991) ; 0.609,-3.101 0.611,-3.101
PHASE_B3: C8_MOTOR3.1 J1_MotorConnection3.2 Q3_MOTOR3.4 Q3_MOTOR3.8 Q4_MOTOR3.1 Q4_MOTOR3.2 Q4_MOTOR3.5 Q4_MOTOR3.6 Q4_MOTOR3.7 R14_MOTOR3.1 U1_MOTOR3.10 | length 38.9
  Top Layer w0.125: v1(-7.775,-12.4) -7.764,-12.389 -7.759,-12.385 -7.754,-12.382 -7.748,-12.38 -7.742,-12.38 -7.588,-12.38 -7.527,-12.374 -7.471,-12.358 -7.42,-12.33 -7.373,-12.291 -6.58,-11.498 -6.455,-11.347 -6.365,-11.182 -6.312,-11.002 -6.294,-10.807 -6.294,-10.534 -6.284,-10.427 -6.254,-10.328 -6.205,-10.237 -6.136,-10.154 -5.503,-9.521 -5.453,-9.479 -5.398,-9.45 -5.338,-9.432 -5.273,-9.426 -5.118,-9.426 -5.113,-9.425 -5.108,-9.424 -5.104,-9.421 -5.1,-9.418 v1(-5.091,-9.409)
  Top Layer w0.15: U1_MOTOR3.10@-4.431,-5.551 -4.078,-5.905 -4.062,-5.924 -4.051,-5.944 -4.044,-5.966 -4.042,-5.99 -4.042,-6.051 -4.038,-6.095 -4.026,-6.136 -4.006,-6.173 -3.978,-6.207 -3.897,-6.288 -3.867,-6.323 -3.847,-6.361 -3.834,-6.403 -3.83,-6.449 v1(-3.83,-6.577)
  Top Layer w1: J1_MotorConnection3.2@-14.25,-14.25 -13.713,-13.503
  Top Layer w1.273: -13.713,-13.503 cw(c-12.89,-14.326) -12.89,-13.162 ccw(c-12.89,-11.515) -11.725,-12.68 -11.599,-12.553
  Bottom Layer w0.125: J1_MotorConnection3.2@-14.25,-14.25 -13.48,-14.25 -13.177,-14.222 -12.896,-14.139 -12.639,-13.999 -12.405,-13.805 -11.632,-13.032 -11.3,-12.756 -10.935,-12.558 -10.537,-12.44 -10.106,-12.4 v1(-7.775,-12.4) ; R14_MOTOR3.1@-13.263,1.846 -13.485,2.068 -13.55,2.122 -13.62,2.16 -13.698,2.183 -13.781,2.191 -13.993,2.191 -14.145,2.177 -14.286,2.135 -14.415,2.066 -14.532,1.968 -14.877,1.623 -15.08,1.379 -15.225,1.11 -15.312,0.818 -15.342,0.501 -15.342,-2.499 -15.304,-2.913 -15.19,-3.296 -15,-3.647 -14.734,-3.966 -14.325,-4.375 -14.149,-4.521 -13.956,-4.625 -13.746,-4.688 -13.518,-4.709 -7.682,-4.709 -7.446,-4.731 -7.227,-4.796 -7.026,-4.904 -6.844,-5.056 -6.61,-5.29 -6.509,-5.374 -6.399,-5.433 -6.279,-5.469 -6.149,-5.481 -5.476,-5.481 -5.211,-5.506 -4.966,-5.578 -4.741,-5.7 -4.536,-5.87 -3.848,-6.559 -3.839,-6.568 v1(-3.83,-6.577) -3.821,-6.585 -3.812,-6.594 -3.801,-6.606 -3.796,-6.611 -3.793,-6.617 -3.792,-6.623 -3.791,-6.629 -3.791,-7.437 -3.821,-7.761 -3.91,-8.06 -4.058,-8.334 -4.266,-8.584 v1(-5.091,-9.409)
PHASE_B4: C8_MOTOR4.1 J1_MotorConnection4.2 Q3_MOTOR4.4 Q3_MOTOR4.8 Q4_MOTOR4.1 Q4_MOTOR4.2 Q4_MOTOR4.5 Q4_MOTOR4.6 Q4_MOTOR4.7 R14_MOTOR4.1 U1_MOTOR4.10 | length 32.1
  Top Layer w0.125: Q4_MOTOR4.6@-10.868,10.328 -10.253,9.713 -10.247,9.707 -10.239,9.703 -10.231,9.701 -10.222,9.7 -10.21,9.7 -10.205,9.7 -10.201,9.698 -10.197,9.696 -10.193,9.693 -10.164,9.664 -10.152,9.654 -10.138,9.646 -10.123,9.642 -10.107,9.641 -8.693,9.641 -8.394,9.668 -8.119,9.75 -7.866,9.887 -7.635,10.079 -7.159,10.555 -7.133,10.586 -7.115,10.62 -7.103,10.658 -7.1,10.698 -7.1,10.754 -7.098,10.776 -7.092,10.797 -7.081,10.816 -7.067,10.833 -5.788,12.112 -5.584,12.282 -5.36,12.403 -5.116,12.476 -4.852,12.5 -4.483,12.5 -4.338,12.513 -4.204,12.553 -4.081,12.62 -3.969,12.713 -2.734,13.948 -2.689,14.002 -2.658,14.06 -2.639,14.124 -2.632,14.193 -2.632,14.289 -2.629,14.327 -2.618,14.362 -2.601,14.394 -2.577,14.423 -2.095,14.905 -1.887,15.078 -1.659,15.201 -1.411,15.275 -1.142,15.3 -0.045,15.3 0.169,15.28 0.367,15.221 0.549,15.123 0.715,14.985 0.927,14.773 1.003,14.682 1.057,14.582 1.089,14.473 1.1,14.355 v1(1.1,13.9) ; v1(-6.991,3.591) -6.943,3.591 -6.924,3.593 -6.906,3.598 -6.89,3.607 -6.875,3.619 -6.812,3.682 -6.81,3.684 -6.808,3.685 -6.805,3.686 -6.803,3.686 -6.799,3.686 -6.797,3.686 -6.796,3.687 -6.795,3.687 -6.794,3.688 -6.474,4.008 -6.466,4.015 -6.458,4.019 -6.449,4.022 -6.439,4.023 -6.426,4.023 -6.42,4.023 C8_MOTOR4.1@-6.414,4.023 -6.409,4.023 C8_MOTOR4.1@-6.403,4.023
  Top Layer w0.15: C8_MOTOR4.1@-6.403,4.023 -6.287,4.023 -6.241,4.027 -6.199,4.039 -6.16,4.06 -6.125,4.09 -6.044,4.17 -6.011,4.199 -5.973,4.219 -5.933,4.231 -5.889,4.235 -5.828,4.235 -5.804,4.237 -5.782,4.244 -5.761,4.255 -5.743,4.27 U1_MOTOR4.10@-5.389,4.624
  Top Layer w1: J1_MotorConnection4.2@-14.25,14.25 -13.307,13.307 cw(c-13.587,13.027) -13.191,13.027
  Top Layer w1.273: -13.191,13.027 ccw(c-11.173,13.027) -12.6,11.6
  Bottom Layer w0.125: v1(-10.2,9.7) -9.815,9.315 -9.677,9.149 -9.579,8.967 -9.52,8.769 -9.5,8.555 -9.5,6.8 -9.456,6.318 -9.323,5.873 -9.102,5.465 -8.793,5.093 -7.403,3.703 -7.353,3.661 -7.298,3.632 -7.238,3.614 -7.173,3.608 -7.018,3.608 -7.013,3.607 -7.008,3.606 -7.004,3.603 -7,3.6 v1(-6.991,3.591) ; v1(1.1,13.9) 1.105,13.9 1.108,13.9 1.11,13.901 1.111,13.902 1.113,13.903 1.236,14.026 1.288,14.069 1.346,14.101 1.409,14.12 1.477,14.126 3.111,14.126 3.202,14.117 3.287,14.092 3.365,14.05 3.436,13.991 3.526,13.901 3.558,13.862 3.581,13.819 3.595,13.773 3.6,13.722 3.6,13.411 3.594,13.344 3.575,13.281 3.544,13.224 3.501,13.172 3.38,13.051 3.348,13.013 3.326,12.972 3.313,12.927 3.308,12.879 R14_MOTOR4.1@3.308,12.755
PHASE_C1: C14_MOTOR1.1 J1_MotorConnection1.3 Q5_MOTOR1.4 Q5_MOTOR1.8 Q6_MOTOR1.1 Q6_MOTOR1.2 Q6_MOTOR1.5 Q6_MOTOR1.6 Q6_MOTOR1.7 R15_MOTOR1.1 U1_MOTOR1.14 | length 28.5
  Top Layer w0.125: v1(14.9,-7.6) 15.235,-7.935 15.246,-7.948 15.254,-7.962 15.258,-7.978 15.26,-7.994 Q6_MOTOR1.5@15.26,-8.036
  Top Layer w0.15: C14_MOTOR1.1@0.371,-17.139 v1@1.201,-16.309 ; U1_MOTOR1.14@0.406,-15.548 1.156,-16.298 1.162,-16.303 1.168,-16.306 1.175,-16.308 1.183,-16.309 v1@1.201,-16.309 ; v1(1.209,-16.309) v1@1.201,-16.309
  Top Layer w1: J1_MotorConnection1.3@15.134,-13.366 16.218,-12.282 ; 16.529,-9.819 17.232,-10.523
  Top Layer w1.273: 16.218,-12.282 16.968,-11.532 ccw(c16.145,-10.709) 17.309,-10.709 ccw(c17.045,-10.709) 17.232,-10.523
  Bottom Layer w0.125: v1(1.209,-16.309) 1.209,-16.071 1.218,-15.978 1.243,-15.891 1.286,-15.812 1.346,-15.74 6.703,-10.383 6.807,-10.305 6.912,-10.279 7.016,-10.305 7.121,-10.383 7.343,-10.605 7.36,-10.62 7.379,-10.63 7.4,-10.636 7.423,-10.638 7.454,-10.638 7.466,-10.637 7.475,-10.634 7.484,-10.634 12.259,-5.859 cw(c12.861,-6.461) 12.861,-5.61 14.639,-5.61 14.766,-5.621 14.889,-5.658 15.001,-5.718 15.104,-5.804 15.234,-5.934 15.281,-5.991 15.315,-6.053 15.335,-6.12 15.342,-6.193 15.342,-6.97 15.331,-7.085 15.299,-7.192 15.247,-7.289 15.173,-7.378 14.967,-7.584 14.958,-7.591 14.949,-7.596 14.939,-7.599 14.928,-7.6 v1(14.9,-7.6)
PHASE_C2: C14_MOTOR2.1 J1_MotorConnection2.3 Q5_MOTOR2.4 Q5_MOTOR2.8 Q6_MOTOR2.1 Q6_MOTOR2.2 Q6_MOTOR2.5 Q6_MOTOR2.6 Q6_MOTOR2.7 R15_MOTOR2.1 U1_MOTOR2.14 | length 22.3
  Top Layer w0.15: U1_MOTOR2.14@7.404,7.525 7.151,7.778 7.06,7.886 6.996,8.006 6.957,8.136 6.944,8.277 6.944,8.608 6.946,8.625 6.95,8.641 6.958,8.656 6.969,8.669 v1(7,8.7) 7.409,9.109 7.412,9.112 7.417,9.114 7.421,9.115 7.426,9.116 7.433,9.116 7.436,9.116 7.438,9.117 7.439,9.119 7.439,9.122 7.439,9.235 7.435,9.279 7.423,9.32 7.402,9.358 7.374,9.392 7.198,9.568 7.111,9.672 7.049,9.786 7.012,9.911 7,10.045 7,12.787 7.013,12.928 7.052,13.057 7.116,13.177 7.206,13.285 Q5_MOTOR2.4@7.459,13.537
  Top Layer w1: 12.509,15.991 J1_MotorConnection2.3@13.366,15.134
  Top Layer w1.2: 8.665,16.547 cw(c10.461,14.751) 10.461,17.291 10.709,17.291 cw(c10.709,16.084) 11.563,16.937
  Top Layer w1.273: 8.059,15.941 8.665,16.547 ; 11.563,16.937 12.509,15.991
  Bottom Layer w0.15: R15_MOTOR2.1@0.898,2.151 0.898,2.188 0.9,2.202 0.904,2.216 0.91,2.228 0.92,2.24 1.488,2.808 1.541,2.872 1.579,2.941 1.601,3.018 1.609,3.1 1.609,3.215 1.613,3.26 1.626,3.302 1.646,3.341 1.676,3.376 v1(7,8.7)
PHASE_C3: C14_MOTOR3.1 J1_MotorConnection3.3 Q5_MOTOR3.4 Q5_MOTOR3.8 Q6_MOTOR3.1 Q6_MOTOR3.2 Q6_MOTOR3.5 Q6_MOTOR3.6 Q6_MOTOR3.7 R15_MOTOR3.1 U1_MOTOR3.14 | length 32.2
  Top Layer w0.125: Q6_MOTOR3.6@-6.968,-14.18 -5.189,-12.402 -5.146,-12.35 -5.116,-12.294 -5.097,-12.232 -5.091,-12.165 -5.091,-11.996 ; -5.092,-11.995 -5.092,-11.505 -5.091,-11.342 -5.085,-11.278 -5.067,-11.219 -5.038,-11.164 -4.997,-11.115 -2.098,-8.216 -1.789,-7.844 -1.568,-7.436 -1.435,-6.991 -1.391,-6.509 -1.391,-4.975 -1.4,-4.878 -1.427,-4.788 -1.471,-4.705 -1.534,-4.63 C14_MOTOR3.1@-1.709,-4.455 -1.164,-3.91 -1.132,-3.872 -1.109,-3.83 -1.096,-3.784 -1.091,-3.735 -1.091,-3.666 -1.094,-3.638 -1.101,-3.613 -1.114,-3.59 -1.131,-3.569 -2.765,-1.935 -2.912,-1.759 -3.016,-1.565 -3.079,-1.355 -3.1,-1.126 -3.1,-0.618 -3.103,-0.584 -3.112,-0.553 -3.128,-0.524 -3.15,-0.498 -3.211,-0.437 -3.223,-0.422 -3.232,-0.406 -3.237,-0.388 -3.239,-0.369 v1(-3.239,-0.321)
  Top Layer w0.15: U1_MOTOR3.14@-3.3,-4.42 -2.967,-4.088 -2.9,-4.032 -2.827,-3.992 -2.747,-3.968 -2.66,-3.96 -2.539,-3.96 -2.491,-3.965 -2.447,-3.978 -2.406,-4 -2.37,-4.03 -2.02,-4.38 -1.98,-4.413 -1.937,-4.437 -1.89,-4.451 -1.839,-4.455 C14_MOTOR3.1@-1.709,-4.455
  Top Layer w1: J1_MotorConnection3.3@-13.366,-15.134 -12.69,-15.962
  Top Layer w1.2: -10.642,-17.262 ccw(c-10.642,-14.722) -8.846,-16.518
  Top Layer w1.273: -12.69,-15.962 -11.743,-16.909 ccw(c-10.89,-16.055) -10.89,-17.262 -10.642,-17.262 ; -8.846,-16.518 -8.24,-15.912
  Bottom Layer w0.125: R15_MOTOR3.1@-9.337,0.837 -8.657,0.157 -8.364,-0.087 -8.042,-0.261 -7.692,-0.365 -7.312,-0.4 -3.456,-0.4 -3.432,-0.398 -3.409,-0.391 -3.389,-0.38 -3.37,-0.364 -3.346,-0.341 -3.336,-0.332 -3.325,-0.326 -3.312,-0.322 -3.299,-0.321 v1(-3.239,-0.321)
PHASE_C4: C14_MOTOR4.1 J1_MotorConnection4.3 Q5_MOTOR4.4 Q5_MOTOR4.8 Q6_MOTOR4.1 Q6_MOTOR4.2 Q6_MOTOR4.5 Q6_MOTOR4.6 Q6_MOTOR4.7 R15_MOTOR4.1 U1_MOTOR4.14 | length 31.6
  Top Layer w0.15: Q6_MOTOR4.6@-14.227,6.969 -14.159,6.969 -14.133,6.967 -14.108,6.959 -14.086,6.947 -14.065,6.93 -13.043,5.908 -12.847,5.745 -12.632,5.629 -12.398,5.559 -12.145,5.536 v1(-11.501,5.536) ; U1_MOTOR4.14@-4.258,3.492 -4.258,3.481 -4.257,3.477 -4.256,3.473 -4.254,3.469 -4.251,3.466 -4.168,3.383 -4.138,3.347 -4.117,3.308 -4.104,3.265 -4.1,3.218 -4.1,2.449 -4.104,2.403 -4.117,2.362 -4.137,2.323 -4.166,2.288 -4.248,2.207 -4.267,2.183 -4.282,2.157 -4.29,2.128 -4.293,2.097 -4.293,2.018 -4.288,1.962 -4.272,1.91 -4.246,1.862 -4.21,1.818 -3.819,1.427 -3.811,1.417 -3.805,1.406 -3.801,1.395 -3.8,1.382 v1(-3.8,1.35)
  Top Layer w1: -16.642,11.858 J1_MotorConnection4.3@-15.134,13.366
  Top Layer w1.273: -16.642,11.858 ccw(c-15.075,10.291) -17.291,10.291 ccw(c-15.559,10.291) -16.784,9.066 -15.959,8.241
  Bottom Layer w0.125: v1(-11.501,5.536) -11.465,5.536 -11.451,5.534 -11.438,5.53 -11.426,5.524 -11.415,5.515 -7.957,2.057 -7.585,1.747 -7.176,1.526 -6.731,1.394 -6.25,1.35 v1(-3.8,1.35) ; v1@-3.825,1.375 -3.495,1.375 -3.365,1.387 -3.245,1.422 -3.135,1.482 -3.034,1.566 -2.575,2.025 -2.411,2.222 -2.294,2.439 -2.223,2.675 -2.2,2.931 -2.2,3.749 -2.17,4.072 -2.082,4.37 -1.934,4.643 -1.727,4.892 R15_MOTOR4.1@2.248,8.866
STM_BEMF_A_MOTOR1: IC1_MOTOR1.27 R9_MOTOR1.1 R13_MOTOR1.2 R16_MOTOR1.2 | length 3.7
  Top Layer w0.15: v1(6.275,-6.975) 6.275,-6.713 6.284,-6.609 6.313,-6.513 6.36,-6.426 6.427,-6.346 IC1_MOTOR1.27@6.7,-6.073
  Bottom Layer w0.15: R13_MOTOR1.2@4.791,-6.639 5.387,-7.236 5.445,-7.284 5.509,-7.318 5.578,-7.339 5.654,-7.346 5.793,-7.346 5.818,-7.344 5.84,-7.337 5.861,-7.326 5.88,-7.31 5.922,-7.268 5.923,-7.267 5.924,-7.267 5.926,-7.266 5.927,-7.266 5.929,-7.266 ; 5.932,-7.265 6.205,-6.992 6.214,-6.984 6.224,-6.979 6.234,-6.976 6.246,-6.975 6.262,-6.975 6.268,-6.974 6.272,-6.972 6.274,-6.968 6.275,-6.962 6.275,-6.931 6.276,-6.918 6.28,-6.907 6.285,-6.896 6.293,-6.887 6.451,-6.729 6.498,-6.672 6.532,-6.611 6.552,-6.543 6.558,-6.47 R16_MOTOR1.2@6.558,-6.285
STM_BEMF_A_MOTOR2: IC1_MOTOR2.27 R9_MOTOR2.1 R13_MOTOR2.2 R16_MOTOR2.2 | length 3.4
  Top Layer w0.15: IC1_MOTOR2.27@1.11,-1.95 1.76,-1.301 1.769,-1.289 1.776,-1.276 1.781,-1.262 1.782,-1.247 v1(1.782,-1.208)
  Bottom Layer w0.15: R16_MOTOR2.2@1.252,-1.738 1.543,-1.447 1.663,-1.327 v1(1.782,-1.208) 1.901,-1.089 2.021,-0.969 2.181,-0.809 2.247,-0.76 2.312,-0.743 2.378,-0.76 2.444,-0.809 R13_MOTOR2.2@3.02,-1.385
STM_BEMF_A_MOTOR3: IC1_MOTOR3.27 R9_MOTOR3.1 R13_MOTOR3.2 R16_MOTOR3.2 | length 6.2
  Top Layer w0.125: v1(-14.044,0.303) -14.02,0.327 -14.011,0.338 -14.005,0.349 -14.001,0.362 -14,0.375 -14,1.51 -13.988,1.641 -13.952,1.762 -13.892,1.873 -13.808,1.974 -13.679,2.103 -13.623,2.149 -13.562,2.182 -13.496,2.202 -13.424,2.209 -13.252,2.209 -13.184,2.203 -13.121,2.184 -13.063,2.153 -13.011,2.109 IC1_MOTOR3.27@-12.775,1.873
  Bottom Layer w0.125: v1(-14.044,0.303) -13.996,0.303 -13.977,0.301 -13.959,0.296 -13.943,0.287 -13.928,0.275 -13.883,0.229 -13.863,0.212 -13.841,0.2 -13.817,0.193 -13.792,0.191 -13.708,0.191 -13.675,0.194 -13.645,0.203 -13.617,0.218 -13.591,0.239 -13.442,0.389 -13.419,0.407 -13.394,0.421 -13.367,0.429 -13.338,0.432 R16_MOTOR3.2@-13.263,0.432 ; R16_MOTOR3.2@-13.284,0.453 -12.52,-0.311 -12.401,-0.47 -12.361,-0.629 -12.401,-0.788 -12.52,-0.947 R13_MOTOR3.2@-12.909,-1.336
STM_BEMF_A_MOTOR4: IC1_MOTOR4.27 R9_MOTOR4.1 R13_MOTOR4.2 R16_MOTOR4.2 | length 3.4
  Top Layer w0.15: v1(1.364,12.225) 1.364,12.264 1.365,12.279 1.369,12.293 1.376,12.306 1.386,12.318 IC1_MOTOR4.27@2.036,12.968
  Bottom Layer w0.15: R13_MOTOR4.2@0.126,12.402 0.595,11.933 0.714,11.844 0.833,11.814 0.953,11.844 1.072,11.933 1.233,12.094 1.298,12.159 v1(1.364,12.225) 1.429,12.291 1.495,12.356 R16_MOTOR4.2@1.894,12.755
STM_BEMF_B_MOTOR1: IC1_MOTOR1.23 R10_MOTOR1.1 R14_MOTOR1.2 R17_MOTOR1.2 | length 4
  Top Layer w0.15: v1(6.821,-7.472) 6.827,-7.472 6.829,-7.473 6.831,-7.473 6.833,-7.474 6.835,-7.476 6.958,-7.599 7.011,-7.643 7.069,-7.674 7.132,-7.693 7.201,-7.699 7.661,-7.699 7.726,-7.693 7.786,-7.676 7.841,-7.646 7.891,-7.604 7.974,-7.521 7.992,-7.506 8.011,-7.496 8.033,-7.489 8.056,-7.487 IC1_MOTOR1.23@8.114,-7.487
  Bottom Layer w0.15: R10_MOTOR1.1@6.205,-8.053 6.774,-7.484 6.78,-7.479 6.786,-7.475 6.794,-7.473 6.801,-7.472 6.812,-7.472 6.816,-7.472 6.82,-7.471 6.824,-7.469 6.827,-7.466 7.254,-7.039 7.259,-7.033 7.263,-7.026 7.265,-7.019 7.265,-7.012 7.265,-7.001 7.267,-6.996 7.272,-6.999 R17_MOTOR1.2@7.973,-7.699
STM_BEMF_B_MOTOR2: IC1_MOTOR2.23 R10_MOTOR2.1 R14_MOTOR2.2 R17_MOTOR2.2 | length 3.9
  Top Layer w0.15: IC1_MOTOR2.23@-0.304,-0.536 -0.246,-0.536 -0.223,-0.534 -0.201,-0.528 -0.182,-0.517 -0.164,-0.502 -0.066,-0.404 -0.024,-0.369 0.023,-0.344 0.073,-0.329 0.128,-0.324 0.607,-0.324 0.677,-0.33 0.741,-0.35 0.8,-0.381 0.854,-0.426 0.975,-0.548 0.977,-0.549 0.979,-0.55 0.981,-0.551 0.983,-0.551 v1(0.989,-0.551)
  Bottom Layer w0.15: R17_MOTOR2.2@-0.162,-0.324 0.533,-1.02 0.542,-1.024 0.545,-1.015 0.545,-1.005 0.545,-1 0.546,-0.996 0.548,-0.993 0.551,-0.99 0.978,-0.562 0.984,-0.557 0.991,-0.554 0.998,-0.552 1.005,-0.551 1.016,-0.551 1.02,-0.551 1.024,-0.549 1.028,-0.548 1.031,-0.545 R10_MOTOR2.1@1.605,0.03
STM_BEMF_B_MOTOR3: IC1_MOTOR3.23 R10_MOTOR3.1 R14_MOTOR3.2 R17_MOTOR3.2 | length 5.5
  Top Layer w0.15: v1(-11.391,1.491) -11.376,1.506 -11.37,1.511 -11.363,1.515 -11.356,1.517 -11.348,1.518 -11.201,1.518 -11.143,1.523 -11.09,1.539 -11.041,1.565 -10.996,1.602 -10.745,1.854 -10.678,1.935 -10.629,2.024 -10.601,2.12 -10.591,2.225 -10.591,2.371 -10.596,2.429 -10.612,2.482 -10.639,2.531 -10.676,2.576 -11.352,3.252 -11.356,3.257 -11.359,3.262 -11.36,3.267 -11.361,3.273 IC1_MOTOR3.23@-11.361,3.287
  Bottom Layer w0.15: R10_MOTOR3.1@-11.495,0.078 -12.238,0.821 -12.357,0.98 -12.397,1.139 -12.357,1.298 -12.238,1.457 -11.881,1.813 -11.864,1.828 -11.845,1.838 -11.825,1.844 -11.802,1.846 -11.771,1.846 -11.759,1.845 -11.748,1.842 -11.738,1.836 -11.728,1.828 v1(-11.391,1.491)
STM_BEMF_B_MOTOR4: IC1_MOTOR4.23 R10_MOTOR4.1 R14_MOTOR4.2 R17_MOTOR4.2 | length 4
  Top Layer w0.15: v1(2.156,11.568) 2.162,11.568 2.165,11.568 2.167,11.567 2.169,11.566 2.171,11.565 2.294,11.442 2.347,11.398 2.405,11.366 2.468,11.347 2.537,11.341 2.997,11.341 3.062,11.347 3.122,11.365 3.177,11.395 3.227,11.437 3.31,11.52 3.328,11.534 3.347,11.545 3.368,11.551 3.391,11.553 IC1_MOTOR4.23@3.45,11.553
  Bottom Layer w0.15: R10_MOTOR4.1@1.541,10.988 2.11,11.557 2.116,11.562 2.122,11.565 2.129,11.567 2.137,11.568 2.148,11.568 2.152,11.569 2.156,11.57 2.159,11.572 2.163,11.574 2.59,12.002 2.595,12.008 2.598,12.014 2.601,12.021 2.601,12.029 2.601,12.04 2.603,12.045 2.607,12.042 R17_MOTOR4.2@3.308,11.341
STM_BEMF_C_MOTOR1: IC1_MOTOR1.8 R11_MOTOR1.1 R15_MOTOR1.2 R18_MOTOR1.2 | length 7.2
  Top Layer w0.15: IC1_MOTOR1.8@3.376,-8.689 IC1_MOTOR1.8@3.376,-8.686 ; IC1_MOTOR1.8@3.378,-8.682 3.737,-8.323 3.891,-8.195 4.061,-8.103 4.246,-8.048 4.446,-8.029 5.234,-8.029 5.35,-8.04 5.456,-8.072 5.554,-8.125 5.644,-8.199 5.758,-8.313 5.807,-8.354 5.861,-8.383 5.92,-8.401 5.983,-8.407 v2(7.265,-8.407)
  Bottom Layer w0.15: v2(7.265,-8.407) 7.071,-8.601 7.011,-8.681 6.991,-8.76 7.011,-8.84 7.071,-8.919 R15_MOTOR1.2@7.619,-9.467 R18_MOTOR1.2@8.68,-8.407
STM_BEMF_C_MOTOR2: IC1_MOTOR2.8 R11_MOTOR2.1 R15_MOTOR2.2 R18_MOTOR2.2 | length 7.2
  Top Layer w0.15: v2(0.545,0.383) 2.177,0.383 2.293,0.372 2.399,0.341 2.497,0.288 2.587,0.213 2.701,0.099 2.75,0.058 2.804,0.029 2.863,0.012 2.926,0.006 3.32,0.006 3.573,0.006 3.672,0.015 3.764,0.042 3.849,0.088 3.925,0.152 IC1_MOTOR2.8@4.432,0.659 ; IC1_MOTOR2.8@4.434,0.663 IC1_MOTOR2.8@4.434,0.666
  Bottom Layer w0.15: R18_MOTOR2.2@-0.87,0.383 R15_MOTOR2.2@0.191,1.444 0.739,0.896 0.799,0.816 0.819,0.737 0.799,0.657 0.739,0.578 v2(0.545,0.383)
STM_BEMF_C_MOTOR3: IC1_MOTOR3.8 R11_MOTOR3.1 R15_MOTOR3.2 R18_MOTOR3.2 | length 6
  Top Layer w0.125: IC1_MOTOR3.8@-10.159,-1.45 -10.665,-0.943 -10.764,-0.825 -10.835,-0.694 -10.877,-0.552 -10.891,-0.399 -10.891,-0.184 -10.883,-0.1 -10.86,-0.022 -10.821,0.05 -10.767,0.115 -10.182,0.7 -10.098,0.8 -10.039,0.911 -10.003,1.031 -9.991,1.161 -9.991,1.457 -9.993,1.473 -9.997,1.489 -10.005,1.502 -10.015,1.515 v1(-10.045,1.545)
  Bottom Layer w0.125: R18_MOTOR3.2@-11.141,2.553 -11.141,2.543 -11.141,2.539 -11.14,2.535 -11.138,2.532 -11.135,2.528 -10.164,1.556 -10.155,1.546 -10.149,1.535 -10.146,1.524 -10.145,1.511 -10.145,1.478 -10.147,1.454 -10.153,1.432 -10.164,1.412 -10.179,1.394 R11_MOTOR3.1@-10.788,0.785
STM_BEMF_C_MOTOR4: IC1_MOTOR4.8 R11_MOTOR4.1 R15_MOTOR4.2 R18_MOTOR4.2 | length 7.2
  Top Layer w0.15: IC1_MOTOR4.8@-1.288,10.351 IC1_MOTOR4.8@-1.288,10.354 ; IC1_MOTOR4.8@-1.286,10.359 -0.927,10.718 -0.773,10.846 -0.603,10.938 -0.418,10.993 -0.218,11.011 0.57,11.011 0.685,11.001 0.792,10.969 0.89,10.916 0.98,10.842 1.094,10.727 1.143,10.687 1.197,10.657 1.255,10.64 1.319,10.634 v2(2.601,10.634)
  Bottom Layer w0.15: v2(2.601,10.634) 2.407,10.44 2.347,10.36 2.327,10.281 2.347,10.201 2.407,10.121 R15_MOTOR4.2@2.955,9.573 R18_MOTOR4.2@4.015,10.634
STM_BEMF_REF_MOTOR1: IC1_MOTOR1.9 R9_MOTOR1.2 R10_MOTOR1.2 R11_MOTOR1.2 | length 3.3
  Top Layer w0.15: IC1_MOTOR1.9@3.73,-9.043 4.167,-8.606 4.179,-8.596 4.192,-8.589 4.206,-8.585 4.221,-8.583 v1(4.26,-8.583)
  Bottom Layer w0.15: v1(4.26,-8.583) 4.552,-8.292 4.671,-8.202 4.791,-8.172 4.91,-8.202 5.029,-8.292 R11_MOTOR1.2@6.205,-9.467
STM_BEMF_REF_MOTOR2: IC1_MOTOR2.9 R9_MOTOR2.2 R10_MOTOR2.2 R11_MOTOR2.2 | length 3.3
  Top Layer w0.15: v1(3.55,0.56) 3.589,0.56 3.604,0.561 3.618,0.565 3.631,0.573 3.643,0.582 IC1_MOTOR2.9@4.08,1.019
  Bottom Layer w0.15: R11_MOTOR2.2@1.605,1.444 2.781,0.268 2.9,0.179 3.019,0.149 3.139,0.179 3.258,0.268 v1(3.55,0.56)
STM_BEMF_REF_MOTOR3: IC1_MOTOR3.9 R9_MOTOR3.2 R10_MOTOR3.2 R11_MOTOR3.2 | length 3.4
  Top Layer w0.125: v1(-10.058,0.058) -10.058,0.028 -10.059,0.016 -10.062,0.005 -10.068,-0.005 -10.076,-0.014 -10.158,-0.096 -10.193,-0.139 -10.219,-0.186 -10.234,-0.237 -10.239,-0.293 -10.239,-0.444 -10.229,-0.55 -10.2,-0.647 -10.152,-0.736 -10.085,-0.817 IC1_MOTOR3.9@-9.805,-1.097
  Bottom Layer w0.125: R9_MOTOR3.2@-11.495,-1.336 R11_MOTOR3.2@-10.081,0.078